# Altium PCB switch-box.PcbDoc (part 2 of 3)
Units mil, origin at the board's own origin, x right, y up, seen from the top; angles counter-clockwise.
Board outline 6943 x 3911 mil, 2 copper layers (Top Layer, Bottom Layer), stack 57 mil thick; 98 components, 104 nets, 383 pads, 129 vias.
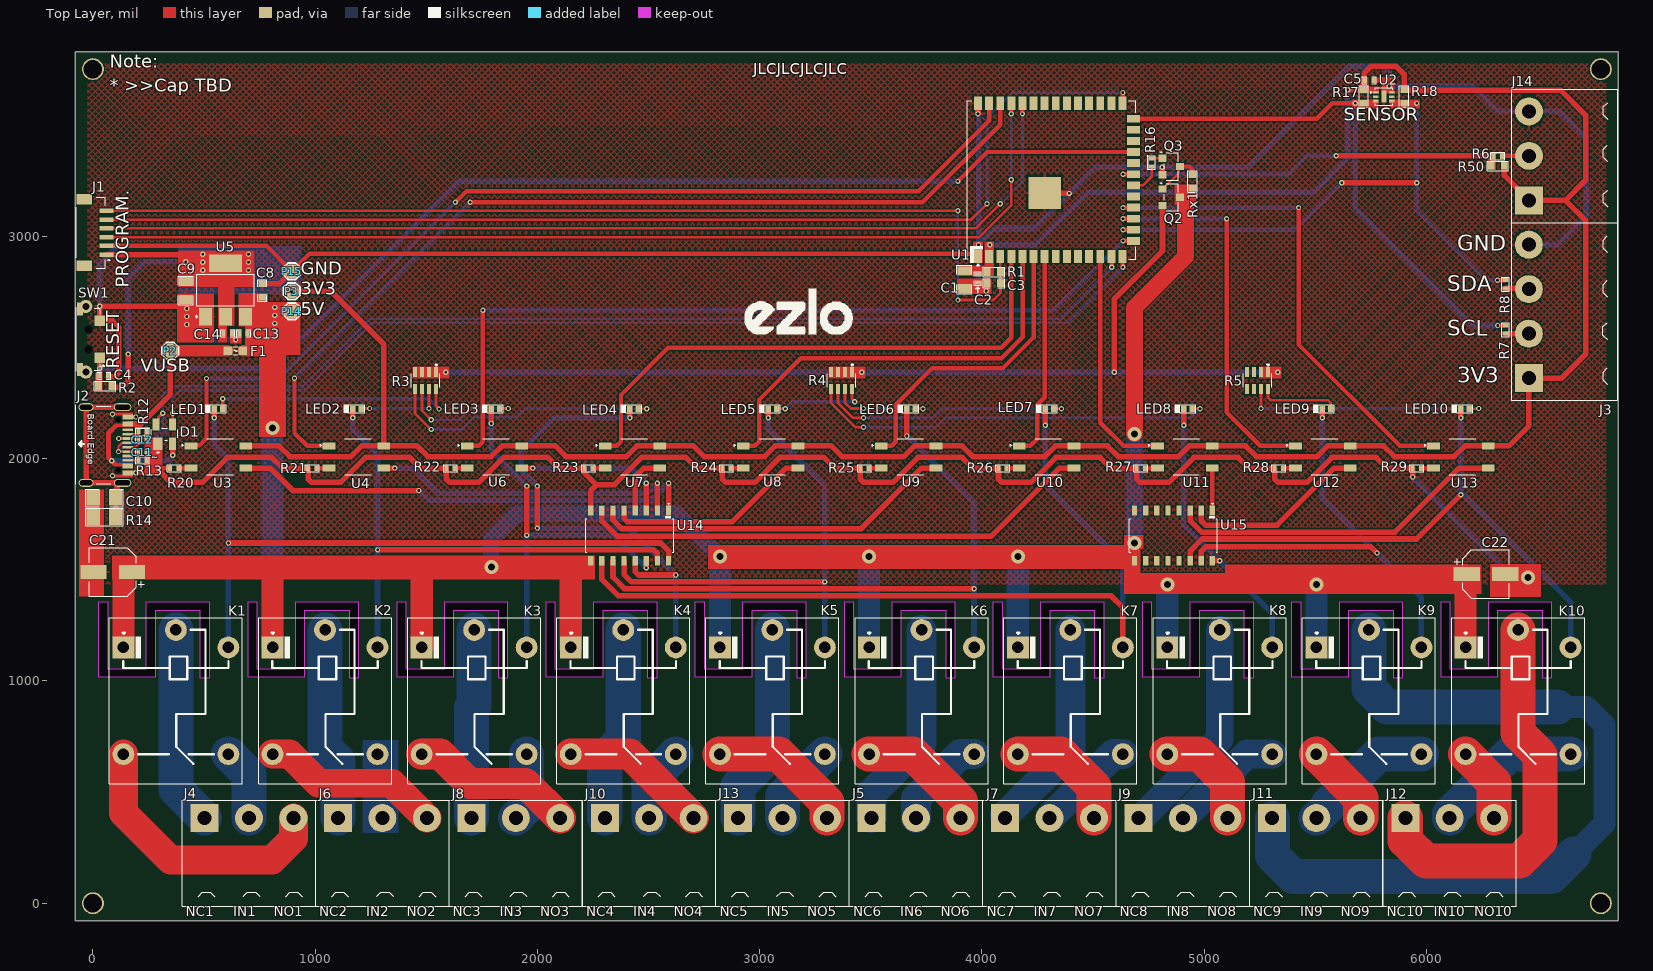
[diagram p0: Top Layer view]

## Part data (continued)
R20 R21 R22 R23 R24 R25 R26 R27 R28 R29: library part RC0402FR-07100RL, "RES 100 OHM 1% 1/16W 0402", Case Code (Imperial)=0402, Case Code (Metric)=1005, LCSC Part Number=C106232, Manufacturer=Yageo, Max Operating Temperature=155°C, Max Power Dissipation=63mW, Min Operating Temperature=-55°C, Power Rating=62.5mW, Resistance Tolerance=1%, Resistor Type="Thick Film", Supplier Part Number 1=603-RC0402FR-07100RL, Temperature Coefficient=100ppm/°C, Voltage Rating=50V, Case/Package=0402, Category="Chip SMD Resistors", ComponentLink1Description=https://datasheet.ciiva.com/11808/0900766b80c66297-11808765.pdf?src-supplier=RSComponents, ComponentLink1URL=https://datasheet.ciiva.com/11808/0900766b80c66297-11808765.pdf?src-supplier=RSComponents, ComponentLink2Description=https://datasheet.ciiva.com/7849/1784430-7849810.pdf?src-supplier=Element14, ComponentLink2URL=https://datasheet.ciiva.com/7849/1784430-7849810.pdf?src-supplier=Element14, ComponentLink3Description=https://datasheet.ciiva.com/28367/1018594-28367226.pdf?src-supplier=Element14, ComponentLink3URL=https://datasheet.ciiva.com/28367/1018594-28367226.pdf?src-supplier=Element14, ComponentLink4Description=https://datasheet.ciiva.com/22747/1018594-22747511.pdf?src-supplier=Element14, ComponentLink4URL=https://datasheet.ciiva.com/22747/1018594-22747511.pdf?src-supplier=Element14, ComponentLink5Description=https://datasheet.ciiva.com/12667/pyu-rc0402-51-rohs-l-6-r-12667957.pdf?src-supplier=Mouser, ComponentLink5URL=https://datasheet.ciiva.com/12667/pyu-rc0402-51-rohs-l-6-r-12667957.pdf?src-supplier=Mouser, ComponentLink6Description=https://datasheet.ciiva.com/15189/getdatasheetpartid-329466-15189335.pdf?src-supplier=Verical, ComponentLink6URL=https://datasheet.ciiva.com/15189/getdatasheetpartid-329466-15189335.pdf?src-supplier=Verical, ComponentLink7Description=https://datasheet.ciiva.com/16740/pyu-rc0402-51-rohs-l-6-r-16740566.pdf?src-supplier=Future+Electronics, ComponentLink7URL=https://datasheet.ciiva.com/16740/pyu-rc0402-51-rohs-l-6-r-16740566.pdf?src-supplier=Future+Electronics, Construction=Rectangular, Depth=0.5mm, Features="Moisture Resistant", Height=0.32mm, Lead Free="Lead Free", Length=1mm, Manufacturer Part Number=RC0402FR-07100RL, Military Standard=Not, Number of Pins=2, Number of Terminations=2, Packaging="Tape and Reel", Pricing 1="1=0.10000, 10=0.01200, 50=0.01200, 100=0.00500, 1000=0.00300, 2500=0.00200, 10000=0.00100 (USD)", REACH SVHC="No SVHC", Resistance=100R, RoHS=Yes, RoHS Compliant=Yes, Series=RC, Size Code=0402, Stock 1=699545, Supplier 1=Mouser, Technology="THICK FILM", Termination=SMD/SMT, Tolerance=1%, Voltage Rating (DC)=50V, Width=0.5mm
SW1: "3.5mm 3.5mm SMDSplicing Black Rectangle button 50mA Surface Mount 7mm SPST 100MΩ 20000 12V 250gf@±50gf SMD Tactile Switches ROHS", LCSC Part Number=C2910695, Manufacturer=YIYUAN, Package=Custom, ComponentLink1Description=LCSC, ComponentLink1URL=https://lcsc.com/product-detail/Tactile-Switches_YIYUAN-YTS-B003-2A_C2910695.html, Item Type=Switch, Manufacturer Part Number=YTS-B003-2A
U1: "RF TXRX MOD WIFI SURFACE MOUNT", LCSC Part Number=C2980296, Manufacturer="Espressif Systems", Supplier Part Number 1=1965-ESP32-S3-WROOM-1U-N4CT-ND, Category=Uncategorized, ComponentLink1Description=LCSC, ComponentLink1URL=https://www.lcsc.com/product-detail/WiFi-Modules_Espressif-Systems-ESP32-WROOM-32-N4_C82899.html, Item Type=Module, Manufacturer Part Number=ESP32-S3-WROOM-1U-N4, Pricing 1="1=3.25000 (USD)", RoHS=No, Stock 1=594, Supplier 1=Digi-Key
U2: "DFN-6-EP(2x2) Temperature and Humidity Sensor ROHS", LCSC Part Number=C2837688, Manufacturer=GXCAS, Package=DFN-6-EP(2x2), ComponentLink1Description=LCSC, ComponentLink1URL=https://www.lcsc.com/product-detail/Temperature-and-Humidity-Sensor_GXCAS-GXHTC3_C2837688.html, Item Type="Temperature & Humidity Sensor", Manufacturer Part Number=GXHTC3
U3 U4 U6 U7 U8 U9 U10 U11 U12 U13: "Optoisolator Transistor Output 3750Vrms 1 Channel", Case/Package=SMD/SMT, Collector Emitter Saturation Voltage=200mV, Collector Emitter Voltage (VCEO)=80V, Current Transfer Ratio=600%, Forward Current=50mA, Forward Voltage=1.4V, Isolation Voltage=3.75kV, LCSC Part Number=C84196, Manufacturer=Isocom, Max Operating Temperature=100°C, Min Operating Temperature=-55°C, Power Dissipation=170mW, Reverse Breakdown Voltage=6V, Category=Optocouplers, ComponentLink1Description=https://datasheet.ciiva.com/26895/getdatasheetpartid-624485-26895717.pdf?src-supplier=Verical, ComponentLink1URL=https://datasheet.ciiva.com/26895/getdatasheetpartid-624485-26895717.pdf?src-supplier=Verical, ComponentLink2Description=https://datasheet.ciiva.com/29301/183289-da-01-en-optokoppler-is181-gb-29301106.pdf?src-supplier=Conrad, ComponentLink2URL=https://datasheet.ciiva.com/29301/183289-da-01-en-optokoppler-is181-gb-29301106.pdf?src-supplier=Conrad, Fall Time=18000ns, Item Type=Optocoupler, Lead Free="Lead Free", Manufacturer Part Number=IS181GB, Mount="Surface Mount", Number of Elements=1, Number of Pins=4, Pricing 1="1=0.55080, 10=0.34190, 25=0.33860, 50=0.33530, 100=0.19360, 250=0.19160, 500=0.18960, 1000=0.14750 (USD)", Radiation Hardening=No, Rise Time=18000ns, RoHS=Yes, RoHS Compliant=Yes, Stock 1=2922, Supplier 1="Arrow Electronics", Supplier Part Number 1=IS181GB
U5: "IC REG LINEAR 3.3V 1.2A SOT223", Case/Package=TO-261-4, Dropout Voltage=600mV, LCSC Part Number=C435835, Manufacturer=STMicroelectronics, Max Input Voltage=18V, Max Operating Temperature=125°C, Min Operating Temperature=-40°C, Min Output Voltage=3.3V, Output Current=1.2A, Power Supply Rejection Ratio (PSRR)=65dB, Quiescent Current=500uA, Supplier Part Number 1=497-17239-6-ND, ComponentLink1Description=LCSC, ComponentLink1URL=https://www.lcsc.com/product-detail/Linear-Voltage-Regulators-LDO_STMicroelectronics-LDL1117S33R_C435835.html, Manufacturer Part Number=LDL1117S33R, Mount="Surface Mount", Number of Regulators=1, Output Configuration=Positive, Output Type=Fixed, Packaging="Tape and Reel", Pricing 1="1=0.45, 10=0.362, 100=0.2465, 500=0.1849, 1000=0.13867 (USD)", Stock 1=13064, Supplier 1=Digi-Key
U14 U15: "100uA@50V 3V@2V,300mA 1.6V@350mA 4mA@12V 100uA@50V 1.25V@350mA 500mA 25pF SOP-16_150mil Darlington Transistor Arrays ROHS", LCSC Part Number=C181730, Manufacturer=Mixic, Package=SOP-16_150mil, ComponentLink1Description=LCSC, ComponentLink1URL=https://www.lcsc.com/product-detail/Darlington-Transistor-Arrays_Mixic-ULN2003A_C181730.html, Item Type=IC, Manufacturer Part Number=ULN2003A

## Free pads (board coordinates)
  round 98.43 hole 82.68: MH1(0,3753) MH2(0,0) MH3(6785,0) MH4(6785,3753)

## Via types
v1: diameter 23.62, hole 11.81, Top Layer to Bottom Layer, tented both sides, 101 vias
v2: diameter 23.62, hole 11.81, Top Layer to Bottom Layer, 18 vias
v3: diameter 62.99, hole 31.5, Top Layer to Bottom Layer, tented both sides, 10 vias

## Nets (pads, with @x,y where several pads share a name; then routed paths per layer and width w, separated by ;. In a path a pad name is that pad's centre, name@x,y a point inside that pad or via, vN(x,y) a via of type N, cw(c..) or ccw(c..) an arc to the next point about the centre after c; other vN are vias at no path point)
3V3: C1.1 C2.1 C5.1 C9.1 C14.1 J1.1 J3.1 J14.1 P3.1 R1.2 R2.2 R17.2 R18.2 R50.2 U1.2 U2.1 U3.4 U4.4 U5.2 U5.4 U6.4 U7.4 U8.4 U9.4 U10.4 U11.4 U12.4 U13.4 | length 14098.4
  Top Layer w10: R17.2@5728.54,3649.15 U2.1@5772.54,3649.15
  Top Layer w25: J1.1@60.7,2918.57 428.43,2918.57 ; R2.2@85,2322 134,2322 159,2347 v1(159,2471) ; C9.1@418,2797 v2(418,2886) 418,2903 ; U5.2@596.55,2640 596.55,2801.55 ; U3.4@687.31,2058 838.09,2058 886.09,2010 1161,2010 1209,2058 U4.4@1308.54,2058 ; v1(895,2752) 897,2754 1070,2754 1308.54,2515.46 U4.4@1308.54,2058 ; R1.2@4024,2843 4026.5,2845.5 4026.5,2866.5 ; U1.2@4029.18,2905.3 U1.2@4034.39,2910.51 ; v1(5646,3660) R17.2@5718,3660 5725,3660 C5.1@5725,3703.5 ; C5.1@5724.5,3704 5720.99,3707.51 5720.99,3736.99 5750,3766 5864,3766 5900,3730 R18.2@5900,3660 5900,3659 6603,3659 6717,3545 6717,3254 6626,3163 ; R50.2@6351,3318 6351,3274 J14.1@6462,3163 6626,3163 ; U4.4@1308.54,2058 1459.33,2058 1507.33,2010 1792,2010 1840,2058 U6.4@1929.78,2058 2080.57,2058 2128.57,2010 2400,2010 2448,2058 U7.4@2551.02,2058 2701.81,2058 2749.81,2010 3022,2010 3070,2058 U8.4@3172.26,2058 3323.05,2058 3371.05,2010 3649,2010 3697,2058 U9.4@3793.5,2058 3911,2058 3959,2010 4283,2010 4331,2058 U10.4@4414.74,2058 4565.52,2058 4613.52,2010 4885,2010 4933,2058 U11.4@5035.98,2058 5186.76,2058 5234.76,2010 5508,2010 5556,2058 U12.4@5657.21,2058 5808,2058 5856,2010 6125,2010 6173,2058 U13.4@6278.45,2058 6371,2058 6461,2148 J3.1@6461,2363 6609,2363 6717,2471 6717,3072 6626,3163
  Bottom Layer w25: v1(159,2471) 159,2814 231,2886 v2(418,2886) ; v1(4035,2963.5) 4241.5,2963.5 4477,3199 5492,3199 5646,3353 v1(5646,3660)
  other v2: 494,2848 700,2848 494,2884 700,2884 494,2920 700,2920
5V: C8.1 C13.1 C21.1 C22.1 F1.2 K1.1 K2.1 K3.1 K4.1 K5.1 K6.1 K7.1 K8.1 K9.1 K10.1 P14.1 Q2.3 Rx1.1 U5.3 U14.9 U15.9 | length 9094.1
  Top Layer w20: Q2.3@4891.37,3177 4916,3177 4935,3177 4947,3189 4947,3219 Rx1.1@4948,3220
  Top Layer w25: U15.9@4687,1540.81 4687,1581 ; K10.1@6173.39,1153.91 6175.81,1151.48 K10.1@6176.24,1151.06
  Top Layer w50: C21.1@141.56,1483.5 148.06,1490 C21.1@175.61,1490 C21.1@181.61,1496 ; C21.1@181.61,1491 808.11,1491 808.11,1502.11 816,1510 1183.5,1510 ; F1.2@674.46,2486 808.11,2486 v3(808.11,2138) ; 1476,1491 1479.12,1487.88 ; 2140.14,1491 2150.14,1481 ; K10.1@6175.81,1150.63 K10.1@6175.81,1151.48 ; K10.1@6176.24,1151.06 K10.1@6178.81,1153.63 ; C22.1@6178.81,1479.43 C22.1@6181.39,1482
  Top Layer w75: v3(4687,2111.81) 4687,2681 4916,2910 4916,3177 4916,3187
  Top Layer w100: K1.1@137.09,1151.06 C21.1@137.09,1483.5 ; K2.1@808.11,1151.06 808.11,1491 ; K3.1@1479.12,1151.06 1479.12,1487.88 ; K4.1@2150.14,1151.06 2150.14,1481 ; K10.1@6175.81,1151.48 C22.1@6175.81,1476.43
  Bottom Layer w75: v3(1793,1512) 1793,1640 1905,1752 2629.3,1752 v3(2821.64,1559.66) ; v3(4687,1621) v3(4687,2111.81)
  Bottom Layer w100: K2.1@808.11,1151.06 v3(808.11,2138) ; K5.1@2821.16,1151.06 v3@2821.16,1559.78 ; K6.1@3492.17,1151.06 v3@3492.17,1559.78 ; K7.1@4161.78,1151.06 v3@4161.78,1559.78 ; K8.1@4834.21,1151.06 v3@4834.21,1434.66 ; K9.1@5505.22,1151.06 v3@5505.22,1434.66
  other v2: 818,2609 818,2645 818,2681
  other v3: 4834.69,1434.66 5505.71,1434.66 3492.66,1559.66 4162.26,1559.66
Cath_1: R20.2 U3.2 | length 56.7
  Top Layer w20: R20.2@384.5,1958 U3.2@441.24,1958
Cath_2: R21.2 U4.2 | length 56.7
  Top Layer w20: R21.2@1005.72,1958 U4.2@1062.48,1958
Cath_3: R22.2 U6.2 | length 56.7
  Top Layer w20: R22.2@1626.94,1958 U6.2@1683.69,1958
Cath_4: R23.2 U7.2 | length 56.7
  Top Layer w20: R23.2@2248.17,1958 U7.2@2304.91,1958
Cath_5: R24.2 U8.2 | length 56.7
  Top Layer w20: R24.2@2869.39,1958 U8.2@2926.2,1958
Cath_6: R25.2 U9.2 | length 56.7
  Top Layer w20: R25.2@3490.61,1958 U9.2@3547.35,1958
Cath_7: R26.2 U10.2 | length 56.7
  Top Layer w20: R26.2@4111.83,1958 U10.2@4168.58,1958
Cath_8: R27.2 U11.2 | length 56.7
  Top Layer w20: R27.2@4733.06,1958 U11.2@4789.8,1958
Cath_9: R28.2 U12.2 | length 56.7
  Top Layer w20: R28.2@5354.28,1958 U12.2@5411.02,1958
Cath_10: R29.2 U13.2 | length 56.7
  Top Layer w20: R29.2@5975.5,1958 U13.2@6032.24,1958
Data: R6.2 R50.1 U1.21 | length 1736.3
  Top Layer w20: v1(4634.8,3280.2) U1.21@4681.61,3280.2
  Top Layer w25: v1(5593.8,3363) 6090,3363 6290,3363
  Bottom Layer w20: v1(4634.8,3280.2) 5380.2,3280.2 5463,3363 v1(5593.8,3363)
EN_: C3.2 J1.6 R1.1 U1.3 | length 4603.1
  Top Layer w12: J1.6@60.7,3115.43 v1@3892,3115.43 ; v1(3892,2714) 4052,2714 4084,2746 4084,2794 C3.2@4083.2,2794.8 ; U1.3@4082.39,2910.51 U1.3@4083.2,2909.71 ; C3.2@4083.2,2791.8 U1.3@4083.2,2906.71
  Bottom Layer w12: v1(3892,2714) v1(3892,3115.39)